# Altium PCB POV_Display.PcbDoc (part 1 of 4)
Units mm, origin at the board's own origin, x right, y up, seen from the top; angles counter-clockwise.
Board outline 207.01 x 48.01 mm, 4 copper layers (Top Layer, GND, Power, Bottom Layer), stack 1.586 mm thick; 227 components, 374 nets, 1196 pads, 657 vias.
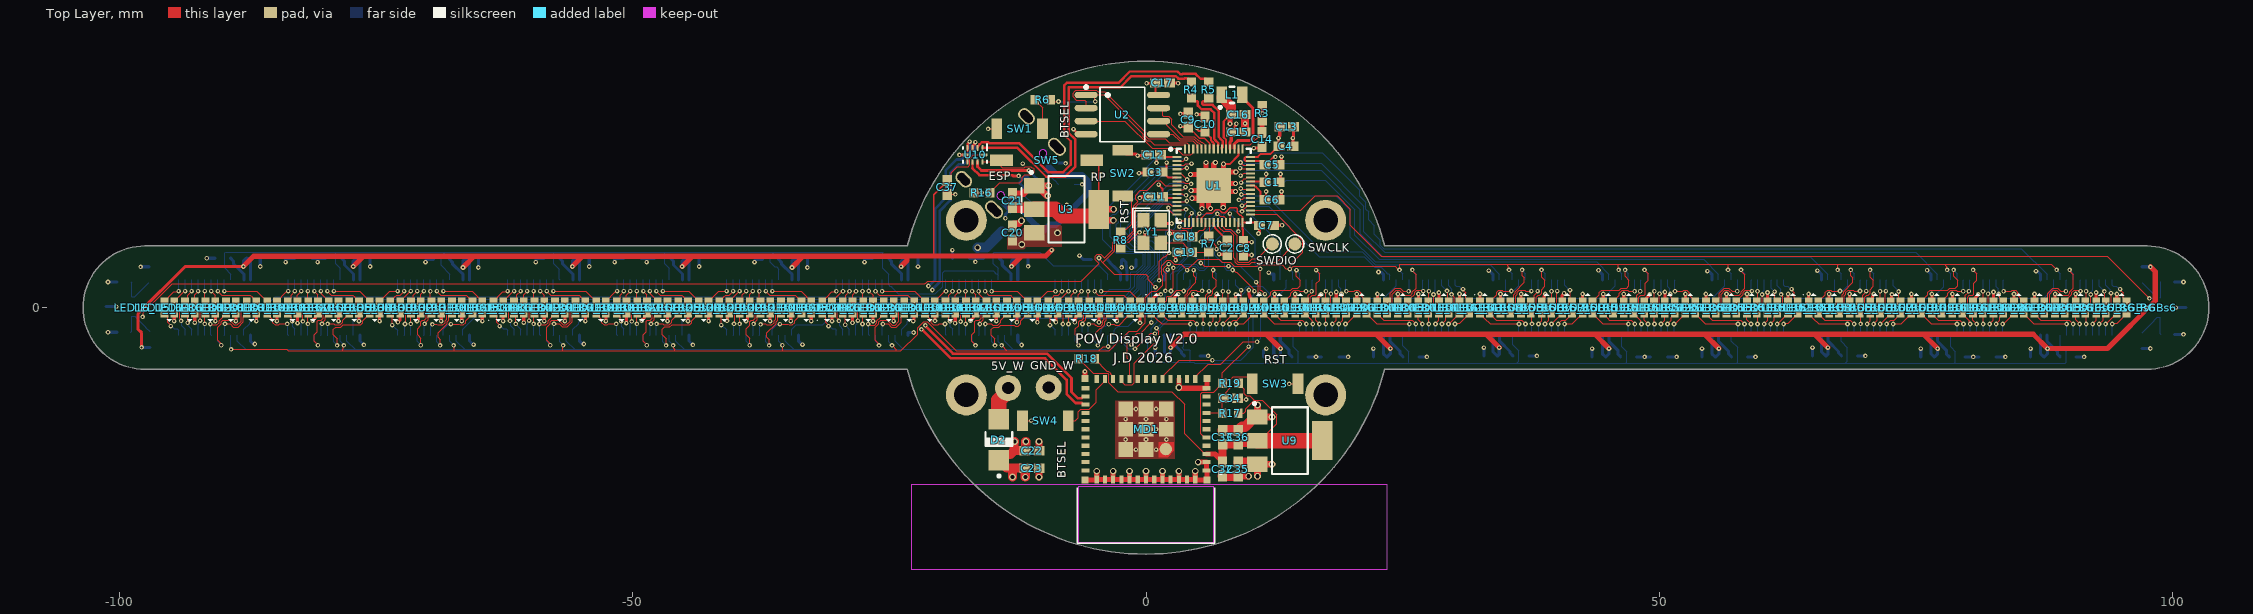
[diagram p0: Top Layer view]
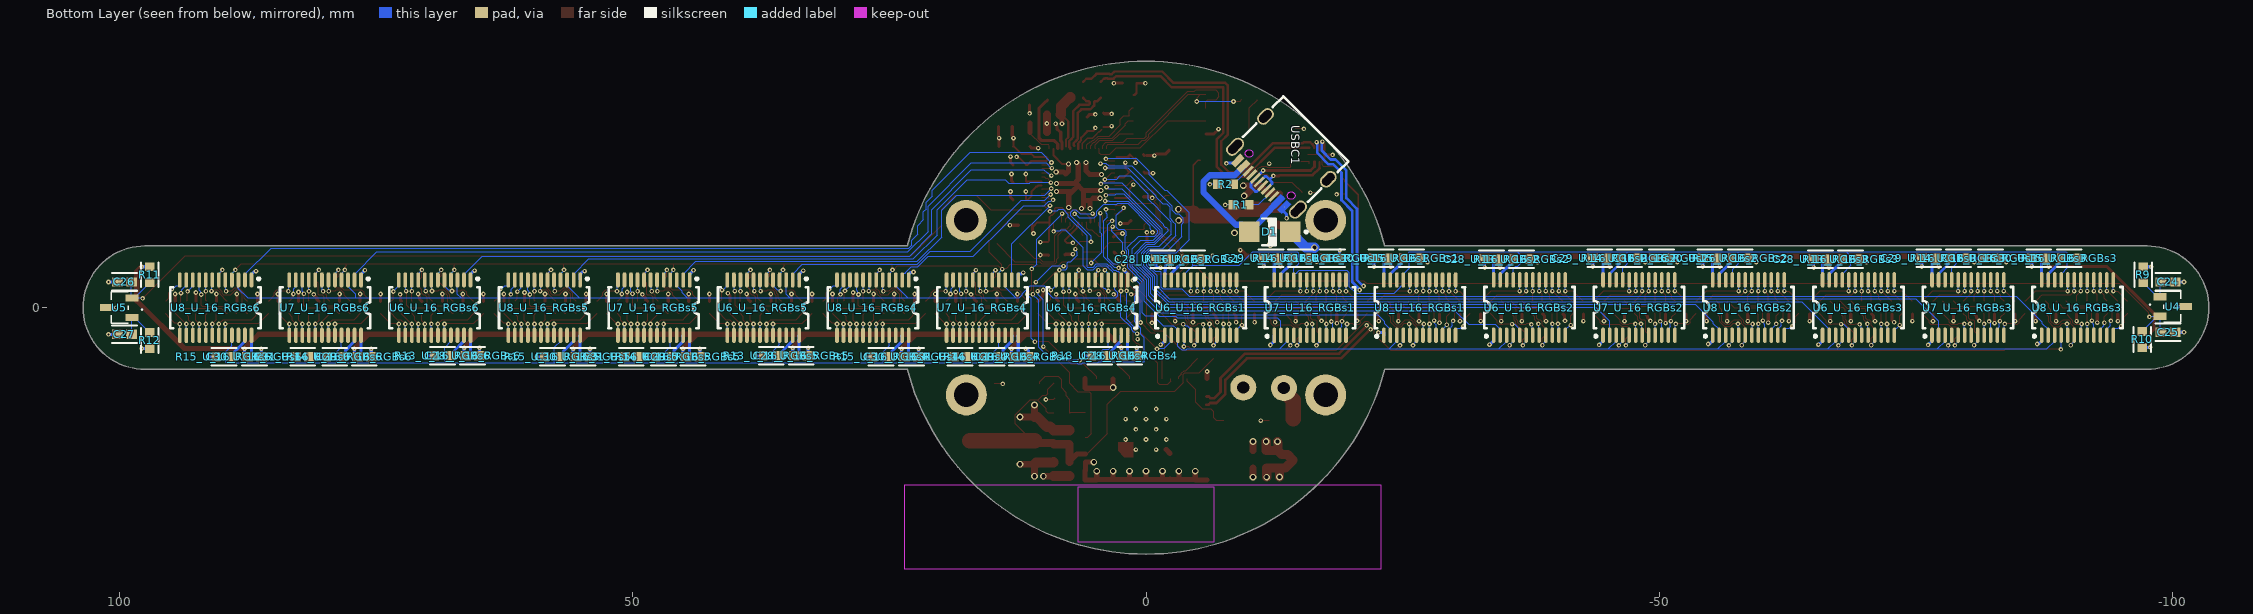
[diagram p1: Bottom Layer view, seen from below]
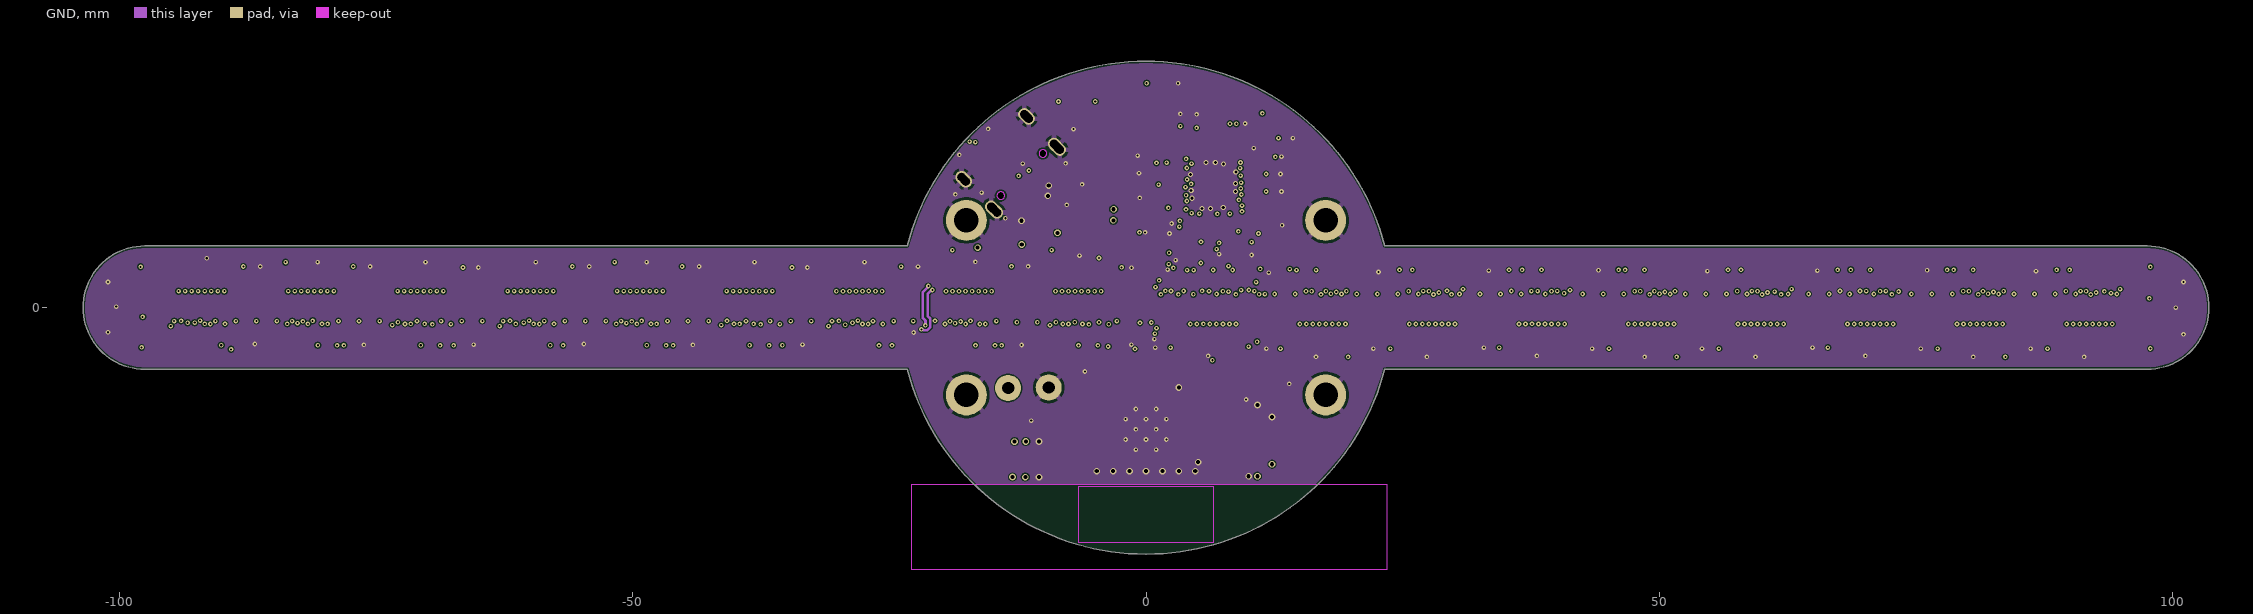
[diagram p2: GND]
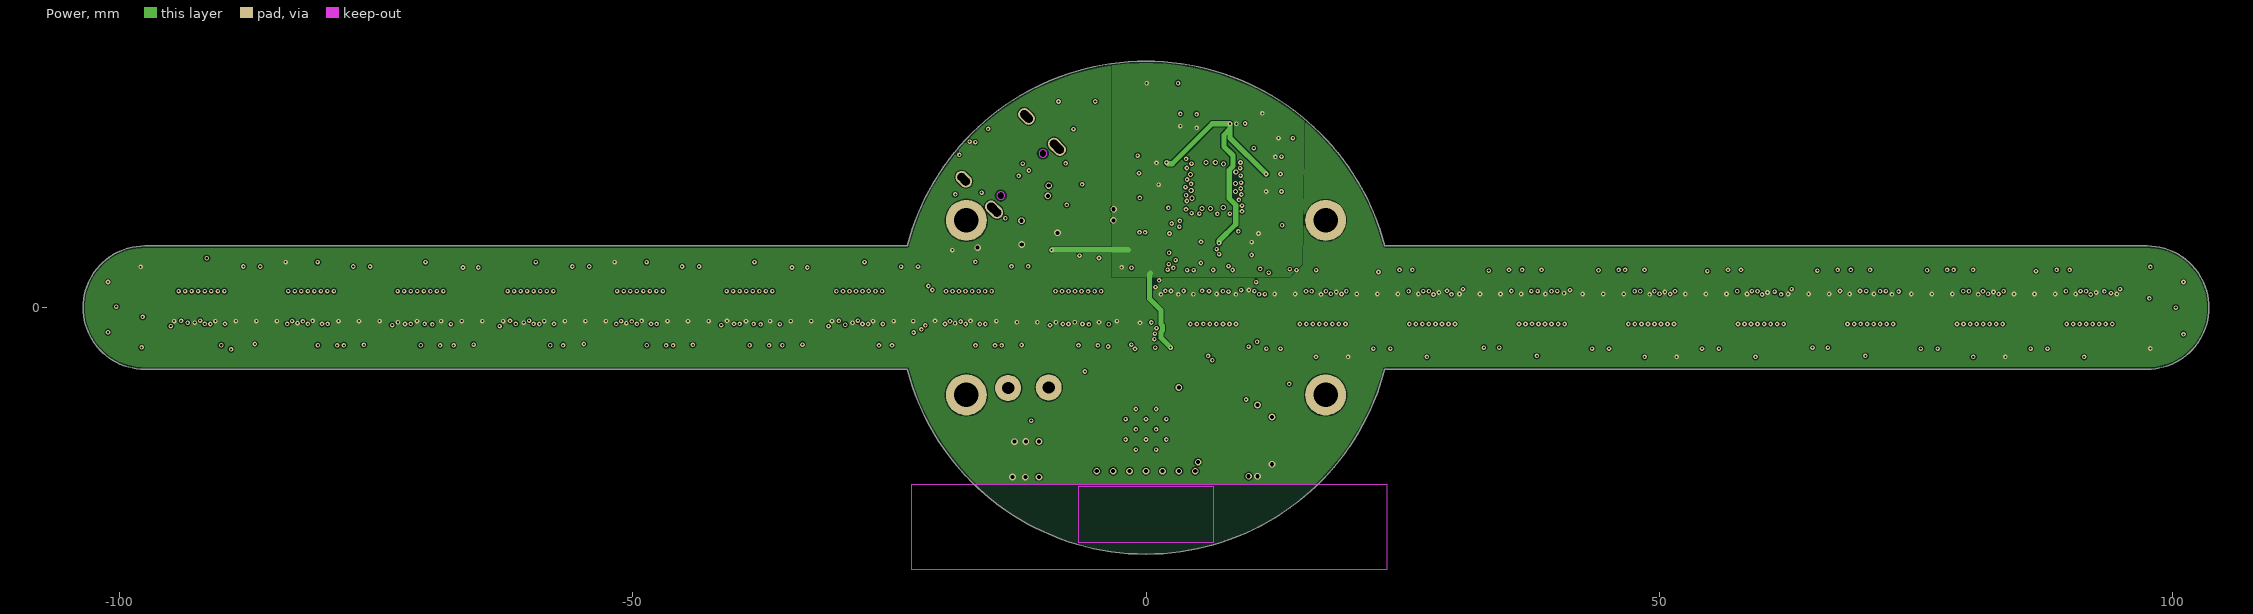
[diagram p3: Power]
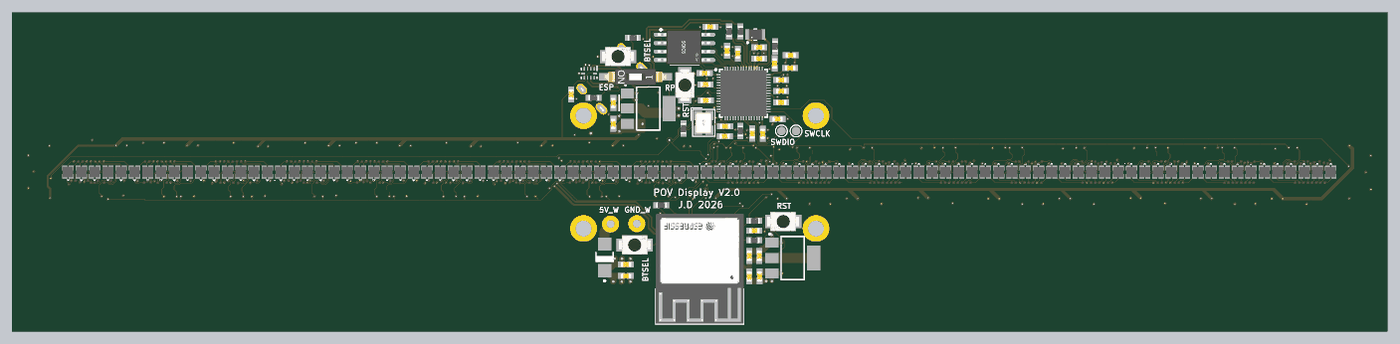
[diagram p7: 3D render of the assembled board from above, using the file's embedded part models]
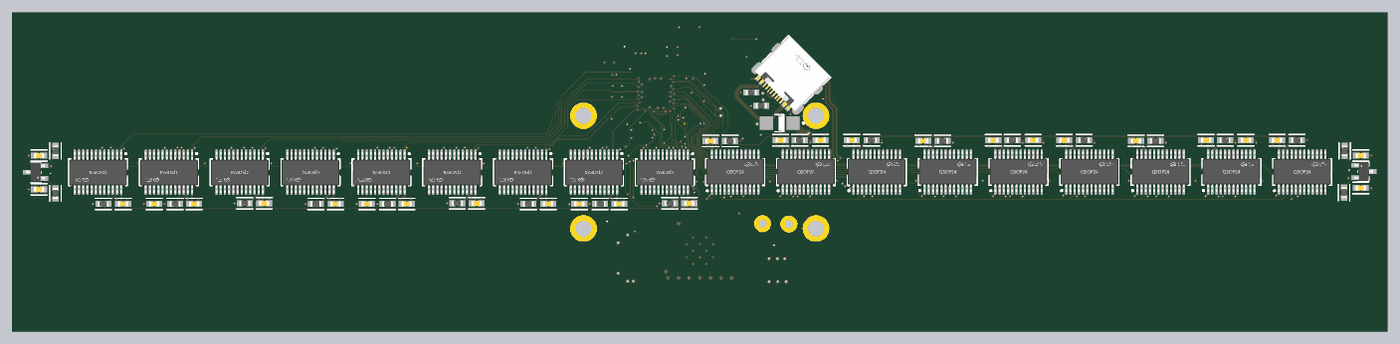
[diagram p8: 3D render of the assembled board from below, using the file's embedded part models]

## Layer stack, top to bottom
Top Solder: solder mask 0.0305, Solder Resist, Dk 3.8
Top Layer: signal copper 0.035
Dielectric 2: prepreg 0.2104, PP-006, Dk 4.4
GND: signal copper 0.0152
Dielectric 1: dielectric 1.065, FR-4, Dk 4.6
Power: signal copper 0.0152
Dielectric 3: prepreg 0.2104, PP-006, Dk 4.4
Bottom Layer: signal copper 0.035
Bottom Solder: solder mask 0.0305, Solder Resist, Dk 3.8

## Board outline
-97.5,-6.005 -23.266,-6.005 -23.244,-6 ccw(c0,0) 0,-24.005 ccw(c0,0) 23.247,-5.986 23.266,-6.005 97.5,-6.005 ccw(c97.5,0) 103.505,0 ccw(c97.5,0) 97.5,6.005 23.246,6.005 23.241,6.011 ccw(c0,0) 0,24.005 ccw(c0,0) -23.241,6.011 -23.246,6.005 -97.5,6.005 ccw(c-97.5,0) -103.505,0 ccw(c-97.5,0)

## Design rules (kind name [scope] priority, off if disabled: settings)
BoardOutlineClearance [All] p1: gap=0.2 ignorepadtopadclearanceinfootprint=FALSE
Clearance [All] p1: gap=0.1 ignorepadtopadclearanceinfootprint=TRUE except(0.35: Arc-THPad Track-THPad)
Clearance Clearance_1 [All] p2: gap=0.1 ignorepadtopadclearanceinfootprint=TRUE
DiffPairsRouting [All] p1: maxlimit=0.203 minlimit=0.203 mostfreqgap=0.203 toplayer_minwidth=0.24 toplayer_maxwidth=0.28 toplayer_prefwidth=0.261 midlayer1_minwidth=0.24 midlayer1_maxwidth=0.28 midlayer1_prefwidth=0.261 midlayer2_minwidth=0.24 midlayer2_maxwidth=0.28 midlayer2_prefwidth=0.261 bottomlayer_minwidth=0.24 bottomlayer_maxwidth=0.28 bottomlayer_prefwidth=0.261 maxuncoupledlength=3
HoleSize [All] p1: absolutevalues=TRUE maxlimit=6.3 minlimit=0.2 maxpercent=80.000 minpercent=20.000
HoleToHoleClearance [All] p1: gap=0.2 allowstackedmicrovias=TRUE
MinimumAnnularRing [Not IsVia] p1: minimumring=0.199
MinimumSolderMaskSliver MinimumSolderMaskSliver_Footprint [InAnyComponent vs InAnyComponent] p1: minsoldermaskwidth=0.09
MinimumSolderMaskSliver [All] p2: minsoldermaskwidth=0.1
PolygonConnect [All] p1: thpad.connectstyle=Relief thpad.reliefconductorwidth=0.5 thpad.reliefentries=4 thpad.polygonreliefangle="90 Angle" thpad.airgapwidth=0.254 thpad.conductorbypadedge=TRUE thpad.mindistance=0.381 thpad.enablemindistance=FALSE smdpad.connectstyle=Direct smdpad.reliefconductorwidth=0.254 smdpad.reliefentries=4 smdpad.polygonreliefangle="90 Angle" smdpad.airgapwidth=0.254 via.connectstyle=Direct via.reliefconductorwidth=0.254 via.reliefentries=4 via.polygonreliefangle="90 Angle" via.airgapwidth=0.254
RoomDefinition U_16_RGBs1 [InComponentClass('U_16_RGBs1')] p1: confinementstyle=ConfineIn formatcopy=TRUE lockcomponents=FALSE outline -0.054,5.8 -32.054,5.8 -32.054,-4.2 -0.054,-4.2
RoomDefinition U_16_RGBs6 [InComponentClass('U_16_RGBs6')] p2: confinementstyle=ConfineIn formatcopy=TRUE lockcomponents=FALSE outline 64,-5.8 96,-5.8 96,4.2 64,4.2
RoomDefinition U_16_RGBs5 [InComponentClass('U_16_RGBs5')] p3: confinementstyle=ConfineIn formatcopy=TRUE lockcomponents=FALSE outline 32,-5.8 64,-5.8 64,4.2 32,4.2
RoomDefinition U_16_RGBs4 [InComponentClass('U_16_RGBs4')] p4: confinementstyle=ConfineIn formatcopy=TRUE lockcomponents=FALSE outline 0,-5.8 32,-5.8 32,4.2 0,4.2
RoomDefinition U_16_RGBs3 [InComponentClass('U_16_RGBs3')] p5: confinementstyle=ConfineIn formatcopy=TRUE lockcomponents=FALSE outline -64.107,5.808 -96.107,5.808 -96.107,-4.192 -64.107,-4.192
RoomDefinition U_16_RGBs2 [InComponentClass('U_16_RGBs2')] p6: confinementstyle=ConfineIn formatcopy=TRUE lockcomponents=FALSE outline -32.071,5.808 -64.071,5.808 -64.071,-4.192 -32.071,-4.192
RoutingVias [All] p1: holewidth=0.2 width=0.45 viastyle="Through Hole" minholewidth=0.2 minwidth=0.45 maxholewidth=0.4 maxwidth=0.65
SilkToSilkClearance [All] p1: silktosilkclearance=0.15
SilkToSolderMaskClearance [IsPad] p1: minsilkscreentomaskgap=0.15 clearancetoexposedcopper=TRUE
SolderMaskExpansion [All] p1: expansion=0 istentingtop=FALSE
SupplyNets "Schematic Supply Nets_7" [InNet('+3V3_ESP')] p1: voltage=0.000
SupplyNets "Schematic Supply Nets_6" [InNet('+3V3_RP')] p2: voltage=0.000
SupplyNets "Schematic Supply Nets_2" [InNet('+1V1')] p3: voltage=0.000
SupplyNets "Schematic Supply Nets_1" [InNet('+5V')] p4: voltage=0.000
SupplyNets "Schematic Supply Nets" [InNet('GND')] p5: voltage=0.000
Width [All] p1: maxlimit=3 minlimit=0.1 preferedwidth=0.1
24 further rules are at their usual default settings.

## Classes and differential pairs
component class U_ESP32: C32 C33 C34 C35 C36 MD1 R17 R18 R19 SW3 SW4 U9
component class U_16_RGBs6: C28_U_16_RGBs6 C29_U_16_RGBs6 C30_U_16_RGBs6 C31_U_16_RGBs6 LED1_U_16_RGBs6 LED2_U_16_RGBs6 LED3_U_16_RGBs6 LED4_U_16_RGBs6 LED5_U_16_RGBs6 LED6_U_16_RGBs6 LED7_U_16_RGBs6 LED8_U_16_RGBs6 LED9_U_16_RGBs6 LED10_U_16_RGBs6 LED11_U_16_RGBs6 LED12_U_16_RGBs6 LED13_U_16_RGBs6 LED14_U_16_RGBs6 LED15_U_16_RGBs6 LED16_U_16_RGBs6 R13_U_16_RGBs6 R14_U_16_RGBs6 R15_U_16_RGBs6 U6_U_16_RGBs6 U7_U_16_RGBs6 U8_U_16_RGBs6
component class U_16_RGBs5: C28_U_16_RGBs5 C29_U_16_RGBs5 C30_U_16_RGBs5 C31_U_16_RGBs5 LED1_U_16_RGBs5 LED2_U_16_RGBs5 LED3_U_16_RGBs5 LED4_U_16_RGBs5 LED5_U_16_RGBs5 LED6_U_16_RGBs5 LED7_U_16_RGBs5 LED8_U_16_RGBs5 LED9_U_16_RGBs5 LED10_U_16_RGBs5 LED11_U_16_RGBs5 LED12_U_16_RGBs5 LED13_U_16_RGBs5 LED14_U_16_RGBs5 LED15_U_16_RGBs5 LED16_U_16_RGBs5 R13_U_16_RGBs5 R14_U_16_RGBs5 R15_U_16_RGBs5 U6_U_16_RGBs5 U7_U_16_RGBs5 U8_U_16_RGBs5
component class U_16_RGBs4: C28_U_16_RGBs4 C29_U_16_RGBs4 C30_U_16_RGBs4 C31_U_16_RGBs4 LED1_U_16_RGBs4 LED2_U_16_RGBs4 LED3_U_16_RGBs4 LED4_U_16_RGBs4 LED5_U_16_RGBs4 LED6_U_16_RGBs4 LED7_U_16_RGBs4 LED8_U_16_RGBs4 LED9_U_16_RGBs4 LED10_U_16_RGBs4 LED11_U_16_RGBs4 LED12_U_16_RGBs4 LED13_U_16_RGBs4 LED14_U_16_RGBs4 LED15_U_16_RGBs4 LED16_U_16_RGBs4 R13_U_16_RGBs4 R14_U_16_RGBs4 R15_U_16_RGBs4 U6_U_16_RGBs4 U7_U_16_RGBs4 U8_U_16_RGBs4
component class U_16_RGBs3: C28_U_16_RGBs3 C29_U_16_RGBs3 C30_U_16_RGBs3 C31_U_16_RGBs3 LED1_U_16_RGBs3 LED2_U_16_RGBs3 LED3_U_16_RGBs3 LED4_U_16_RGBs3 LED5_U_16_RGBs3 LED6_U_16_RGBs3 LED7_U_16_RGBs3 LED8_U_16_RGBs3 LED9_U_16_RGBs3 LED10_U_16_RGBs3 LED11_U_16_RGBs3 LED12_U_16_RGBs3 LED13_U_16_RGBs3 LED14_U_16_RGBs3 LED15_U_16_RGBs3 LED16_U_16_RGBs3 R13_U_16_RGBs3 R14_U_16_RGBs3 R15_U_16_RGBs3 U6_U_16_RGBs3 U7_U_16_RGBs3 U8_U_16_RGBs3
component class U_16_RGBs2: C28_U_16_RGBs2 C29_U_16_RGBs2 C30_U_16_RGBs2 C31_U_16_RGBs2 LED1_U_16_RGBs2 LED2_U_16_RGBs2 LED3_U_16_RGBs2 LED4_U_16_RGBs2 LED5_U_16_RGBs2 LED6_U_16_RGBs2 LED7_U_16_RGBs2 LED8_U_16_RGBs2 LED9_U_16_RGBs2 LED10_U_16_RGBs2 LED11_U_16_RGBs2 LED12_U_16_RGBs2 LED13_U_16_RGBs2 LED14_U_16_RGBs2 LED15_U_16_RGBs2 LED16_U_16_RGBs2 R13_U_16_RGBs2 R14_U_16_RGBs2 R15_U_16_RGBs2 U6_U_16_RGBs2 U7_U_16_RGBs2 U8_U_16_RGBs2
component class U_16_RGBs1: C28_U_16_RGBs1 C29_U_16_RGBs1 C30_U_16_RGBs1 C31_U_16_RGBs1 LED1_U_16_RGBs1 LED2_U_16_RGBs1 LED3_U_16_RGBs1 LED4_U_16_RGBs1 LED5_U_16_RGBs1 LED6_U_16_RGBs1 LED7_U_16_RGBs1 LED8_U_16_RGBs1 LED9_U_16_RGBs1 LED10_U_16_RGBs1 LED11_U_16_RGBs1 LED12_U_16_RGBs1 LED13_U_16_RGBs1 LED14_U_16_RGBs1 LED15_U_16_RGBs1 LED16_U_16_RGBs1 R13_U_16_RGBs1 R14_U_16_RGBs1 R15_U_16_RGBs1 U6_U_16_RGBs1 U7_U_16_RGBs1 U8_U_16_RGBs1
channel class 16_RGBs: U_16_RGBs1 U_16_RGBs2 U_16_RGBs3 U_16_RGBs4 U_16_RGBs5 U_16_RGBs6
component class U_RP2350: C1 C2 C3 C4 C5 C6 C7 C8 C9 C10 C11 C12 C13 C14 C15 C16 C17 C18 C19 C20 C21 L1 R3 R4 R5 R6 R7 R8 SW1 SW2 SWCLK SWDIO U1 U2 U3 Y1
component class POV_Display: 5V_W C22 C23 C24 C25 C26 C27 C37 D1 D2 GND_W R1 R2 R9 R10 R11 R12 R16 SW5 U4 U5 U10 USBC1
differential pair USB_D: +USB_D_P -USB_D_N
differential pair RP_USB_D: +RP_USB_D_P -RP_USB_D_N
differential pair ESP_USB_D: +ESP_USB_D_P -ESP_USB_D_N
differential pair USB_MCU_D: +USB_MCU_D_P -USB_MCU_D_N

## Components (designator, comment, footprint, x,y, rotation, side; value= is the part's Value field where it differs from the comment)
5V_W "Wireless +5V input" "THT 100mil pad-Footprint-1" -13.425,-7.825 r0 top
C1 "Cap 100nF 0603" FP-CC0603-DA-IPC_B 12.954,12.2 r180 top value=100nF
C2 "Cap 4.7uF 0603" FP-CC0603-DA-IPC_B 7.9,5.146 r90 top value=4.7uF
C3 "Cap 100nF 0603" FP-CC0603-DA-IPC_B 0.2,13.2 r0 top value=100nF
C4 "Cap 100nF 0603" FP-CC0603-DA-IPC_B 14.3,15.7 r180 top value=100nF
C5 "Cap 100nF 0603" FP-CC0603-DA-IPC_B 12.954,13.9 r180 top value=100nF
C6 "Cap 100nF 0603" FP-CC0603-DA-IPC_B 12.954,10.5 r180 top value=100nF
C7 "Cap 100nF 0603" FP-CC0603-DA-IPC_B 12.404,8 r180 top value=100nF
C8 "Cap 100nF 0603" FP-CC0603-DA-IPC_B 9.5,5.1 r90 top value=100nF
C9 "Cap 100nF 0603" FP-CC0603-DA-IPC_B 4.125,18.95 r270 top value=100nF
C10 "Cap 100nF 0603" FP-CC0603-DA-IPC_B 5.75,18.55 r270 top value=100nF
C11 "Cap 100nF 0603" FP-CC0603-DA-IPC_B 0.246,10.8 r0 top value=100nF
C12 "Cap 100nF 0603" FP-CC0603-DA-IPC_B 0.071,14.9 r0 top value=100nF
C13 "Cap 22uF 0603" FP-CC0603-DA-IPC_B 14.375,17.625 r180 top value=22uF
C14 "Cap 4.7uF 0603" FP-CC0603-DA-IPC_B 11.3,15.7 r90 top value=4.7uF
C15 "Cap 4.7uF 0603" FP-CC0603-DA-IPC_B 9.654,17.1 r180 top value=4.7uF
C16 "Cap 4.7uF 0603" FP-CC0603-DA-IPC_B 9.654,18.8 r180 top value=4.7uF
C17 "Cap 100nF 0603" FP-CC0603-DA-IPC_B 0.921,21.875 r0 top value=100nF
C18 "Cap 15pF 0603" FP-CC0603-DA-IPC_B 3.146,6.9 r0 top value=15pF
C19 "Cap 15pF 0603" FP-CC0603-DA-IPC_B 4.454,5.4 r180 top value=15pF
C20 "Cap 10uF 0603" FP-CC0603-DA-IPC_B -13,7.954 r270 top value=10uF
C21 "Cap 10uF 0603" FP-CC0603-DA-IPC_B -13,11.1 r270 top value=10uF
C22 "Cap 22uF 0603" FP-CC0603-DA-IPC_B -11.775,-13.925 r0 top value=22uF
C23 "Cap 100nF 0603" FP-CC0603-DA-IPC_B -11.779,-15.625 r0 top value=100nF
C24 "Cap 4.7nF 0603" FP-CC0603-DA-IPC_B -100.2,2.5 r0 bottom value=4.7nF
C25 "Cap 1nF 0603" FP-CC0603-DA-IPC_B -100.2,-2.4 r0 bottom value=1nF
C26 "Cap 1nF 0603" FP-CC0603-DA-IPC_B 100.154,2.5 r180 bottom value=1nF
C27 "Cap 4.7nF 0603" FP-CC0603-DA-IPC_B 100.154,-2.6 r180 bottom value=4.7nF
C28_U_16_RGBs1 "Cap 100nF 0603" FP-CC0603-DA-IPC_B -2.308,4.7 r0 bottom value=100nF (schematic designator C28)
C28_U_16_RGBs2 "Cap 100nF 0603" FP-CC0603-DA-IPC_B -34.325,4.708 r0 bottom value=100nF (schematic designator C28)
C28_U_16_RGBs3 "Cap 100nF 0603" FP-CC0603-DA-IPC_B -66.361,4.708 r0 bottom value=100nF (schematic designator C28)
C28_U_16_RGBs4 "Cap 100nF 0603" FP-CC0603-DA-IPC_B 2.254,-4.7 r180 bottom value=100nF (schematic designator C28)
C28_U_16_RGBs5 "Cap 100nF 0603" FP-CC0603-DA-IPC_B 34.254,-4.7 r180 bottom value=100nF (schematic designator C28)
C28_U_16_RGBs6 "Cap 100nF 0603" FP-CC0603-DA-IPC_B 66.254,-4.7 r180 bottom value=100nF (schematic designator C28)
C29_U_16_RGBs1 "Cap 100nF 0603" FP-CC0603-DA-IPC_B -12.854,4.8 r0 bottom value=100nF (schematic designator C29)
C29_U_16_RGBs2 "Cap 100nF 0603" FP-CC0603-DA-IPC_B -44.871,4.808 r0 bottom value=100nF (schematic designator C29)
C29_U_16_RGBs3 "Cap 100nF 0603" FP-CC0603-DA-IPC_B -76.908,4.808 r0 bottom value=100nF (schematic designator C29)
C29_U_16_RGBs4 "Cap 100nF 0603" FP-CC0603-DA-IPC_B 12.8,-4.8 r180 bottom value=100nF (schematic designator C29)
C29_U_16_RGBs5 "Cap 100nF 0603" FP-CC0603-DA-IPC_B 44.8,-4.8 r180 bottom value=100nF (schematic designator C29)
C29_U_16_RGBs6 "Cap 100nF 0603" FP-CC0603-DA-IPC_B 76.8,-4.8 r180 bottom value=100nF (schematic designator C29)
C30_U_16_RGBs1 "Cap 100nF 0603" FP-CC0603-DA-IPC_B -23.554,4.8 r0 bottom value=100nF (schematic designator C30)
C30_U_16_RGBs2 "Cap 100nF 0603" FP-CC0603-DA-IPC_B -55.571,4.808 r0 bottom value=100nF (schematic designator C30)
C30_U_16_RGBs3 "Cap 100nF 0603" FP-CC0603-DA-IPC_B -87.607,4.808 r0 bottom value=100nF (schematic designator C30)
C30_U_16_RGBs4 "Cap 100nF 0603" FP-CC0603-DA-IPC_B 23.5,-4.8 r180 bottom value=100nF (schematic designator C30)
C30_U_16_RGBs5 "Cap 100nF 0603" FP-CC0603-DA-IPC_B 55.5,-4.8 r180 bottom value=100nF (schematic designator C30)
C30_U_16_RGBs6 "Cap 100nF 0603" FP-CC0603-DA-IPC_B 87.5,-4.8 r180 bottom value=100nF (schematic designator C30)
C31_U_16_RGBs1 "Cap 22uF 0603" FP-CC0603-DA-IPC_B -17.5,4.8 r180 bottom value=22uF (schematic designator C31)
C31_U_16_RGBs2 "Cap 22uF 0603" FP-CC0603-DA-IPC_B -49.517,4.808 r180 bottom value=22uF (schematic designator C31)
C31_U_16_RGBs3 "Cap 22uF 0603" FP-CC0603-DA-IPC_B -81.554,4.808 r180 bottom value=22uF (schematic designator C31)
C31_U_16_RGBs4 "Cap 22uF 0603" FP-CC0603-DA-IPC_B 17.446,-4.8 r0 bottom value=22uF (schematic designator C31)
C31_U_16_RGBs5 "Cap 22uF 0603" FP-CC0603-DA-IPC_B 49.446,-4.8 r0 bottom value=22uF (schematic designator C31)
C31_U_16_RGBs6 "Cap 22uF 0603" FP-CC0603-DA-IPC_B 81.446,-4.8 r0 bottom value=22uF (schematic designator C31)
C32 "Cap 100nF 0603" FP-CC0603-DA-IPC_B 7.45,-16.4 r90 top value=100nF
C33 "Cap 22uF 0603" FP-CC0603-DA-IPC_B 7.475,-11.95 r270 top value=22uF
C34 "Cap 100nF 0603" FP-CC0603-DA-IPC_B 8.904,-8.825 r180 top value=100nF
C35 "Cap 10uF 0603" FP-CC0603-DA-IPC_B 9,-16.404 r90 top value=10uF
C36 "Cap 10uF 0603" FP-CC0603-DA-IPC_B 8.975,-11.95 r270 top value=10uF
C37 "Cap 100nF 0603" FP-CC0603-DA-IPC_B -19.35,11.025 r90 top value=100nF
D1 "MBRA140T3G" ONSC-SMA-2-403D-02_V -12.05,7.375 r0 bottom
D2 "MBRA140T3G" ONSC-SMA-2-403D-02_V -14.325,-12.85 r90 top
GND_W "Wireless ground" "THT 100mil pad-Footprint-1" -9.475,-7.775 r0 top
L1 "AOTA-B201610S3R3-101-T" AOTA-B201610S3R3-101-T-Footprint-1 8.375,20.725 r180 top value=3.3uH
LED1_U_16_RGBs1 "EKINGLUX E6C0606RGBC3UDA" "EKINGLUX E6C0606RGBC3UDA-Footprint-1" -1.054,0 r270 top (schematic designator LED1)
LED1_U_16_RGBs2 "EKINGLUX E6C0606RGBC3UDA" "EKINGLUX E6C0606RGBC3UDA-Footprint-1" -33.071,0.008 r270 top (schematic designator LED1)
LED1_U_16_RGBs3 "EKINGLUX E6C0606RGBC3UDA" "EKINGLUX E6C0606RGBC3UDA-Footprint-1" -65.107,0.008 r270 top (schematic designator LED1)
LED1_U_16_RGBs4 "EKINGLUX E6C0606RGBC3UDA" "EKINGLUX E6C0606RGBC3UDA-Footprint-1" 1,0 r90 top (schematic designator LED1)
LED1_U_16_RGBs5 "EKINGLUX E6C0606RGBC3UDA" "EKINGLUX E6C0606RGBC3UDA-Footprint-1" 33,0 r90 top (schematic designator LED1)
LED1_U_16_RGBs6 "EKINGLUX E6C0606RGBC3UDA" "EKINGLUX E6C0606RGBC3UDA-Footprint-1" 65,0 r90 top (schematic designator LED1)
LED2_U_16_RGBs1 "EKINGLUX E6C0606RGBC3UDA" "EKINGLUX E6C0606RGBC3UDA-Footprint-1" -3.054,0 r270 top (schematic designator LED2)
LED2_U_16_RGBs2 "EKINGLUX E6C0606RGBC3UDA" "EKINGLUX E6C0606RGBC3UDA-Footprint-1" -35.071,0.008 r270 top (schematic designator LED2)
LED2_U_16_RGBs3 "EKINGLUX E6C0606RGBC3UDA" "EKINGLUX E6C0606RGBC3UDA-Footprint-1" -67.107,0.008 r270 top (schematic designator LED2)
LED2_U_16_RGBs4 "EKINGLUX E6C0606RGBC3UDA" "EKINGLUX E6C0606RGBC3UDA-Footprint-1" 3,0 r90 top (schematic designator LED2)
LED2_U_16_RGBs5 "EKINGLUX E6C0606RGBC3UDA" "EKINGLUX E6C0606RGBC3UDA-Footprint-1" 35,0 r90 top (schematic designator LED2)
LED2_U_16_RGBs6 "EKINGLUX E6C0606RGBC3UDA" "EKINGLUX E6C0606RGBC3UDA-Footprint-1" 67,0 r90 top (schematic designator LED2)
LED3_U_16_RGBs1 "EKINGLUX E6C0606RGBC3UDA" "EKINGLUX E6C0606RGBC3UDA-Footprint-1" -5.054,0 r270 top (schematic designator LED3)
LED3_U_16_RGBs2 "EKINGLUX E6C0606RGBC3UDA" "EKINGLUX E6C0606RGBC3UDA-Footprint-1" -37.071,0.008 r270 top (schematic designator LED3)
LED3_U_16_RGBs3 "EKINGLUX E6C0606RGBC3UDA" "EKINGLUX E6C0606RGBC3UDA-Footprint-1" -69.107,0.008 r270 top (schematic designator LED3)
LED3_U_16_RGBs4 "EKINGLUX E6C0606RGBC3UDA" "EKINGLUX E6C0606RGBC3UDA-Footprint-1" 5,0 r90 top (schematic designator LED3)
LED3_U_16_RGBs5 "EKINGLUX E6C0606RGBC3UDA" "EKINGLUX E6C0606RGBC3UDA-Footprint-1" 37,0 r90 top (schematic designator LED3)
LED3_U_16_RGBs6 "EKINGLUX E6C0606RGBC3UDA" "EKINGLUX E6C0606RGBC3UDA-Footprint-1" 69,0 r90 top (schematic designator LED3)
LED4_U_16_RGBs1 "EKINGLUX E6C0606RGBC3UDA" "EKINGLUX E6C0606RGBC3UDA-Footprint-1" -7.054,0 r270 top (schematic designator LED4)
LED4_U_16_RGBs2 "EKINGLUX E6C0606RGBC3UDA" "EKINGLUX E6C0606RGBC3UDA-Footprint-1" -39.071,0.008 r270 top (schematic designator LED4)
LED4_U_16_RGBs3 "EKINGLUX E6C0606RGBC3UDA" "EKINGLUX E6C0606RGBC3UDA-Footprint-1" -71.107,0.008 r270 top (schematic designator LED4)
LED4_U_16_RGBs4 "EKINGLUX E6C0606RGBC3UDA" "EKINGLUX E6C0606RGBC3UDA-Footprint-1" 7,0 r90 top (schematic designator LED4)
LED4_U_16_RGBs5 "EKINGLUX E6C0606RGBC3UDA" "EKINGLUX E6C0606RGBC3UDA-Footprint-1" 39,0 r90 top (schematic designator LED4)
LED4_U_16_RGBs6 "EKINGLUX E6C0606RGBC3UDA" "EKINGLUX E6C0606RGBC3UDA-Footprint-1" 71,0 r90 top (schematic designator LED4)
LED5_U_16_RGBs1 "EKINGLUX E6C0606RGBC3UDA" "EKINGLUX E6C0606RGBC3UDA-Footprint-1" -9.054,0 r270 top (schematic designator LED5)
LED5_U_16_RGBs2 "EKINGLUX E6C0606RGBC3UDA" "EKINGLUX E6C0606RGBC3UDA-Footprint-1" -41.071,0.008 r270 top (schematic designator LED5)
LED5_U_16_RGBs3 "EKINGLUX E6C0606RGBC3UDA" "EKINGLUX E6C0606RGBC3UDA-Footprint-1" -73.107,0.008 r270 top (schematic designator LED5)
LED5_U_16_RGBs4 "EKINGLUX E6C0606RGBC3UDA" "EKINGLUX E6C0606RGBC3UDA-Footprint-1" 9,0 r90 top (schematic designator LED5)
LED5_U_16_RGBs5 "EKINGLUX E6C0606RGBC3UDA" "EKINGLUX E6C0606RGBC3UDA-Footprint-1" 41,0 r90 top (schematic designator LED5)
LED5_U_16_RGBs6 "EKINGLUX E6C0606RGBC3UDA" "EKINGLUX E6C0606RGBC3UDA-Footprint-1" 73,0 r90 top (schematic designator LED5)
LED6_U_16_RGBs1 "EKINGLUX E6C0606RGBC3UDA" "EKINGLUX E6C0606RGBC3UDA-Footprint-1" -11.054,0 r270 top (schematic designator LED6)
LED6_U_16_RGBs2 "EKINGLUX E6C0606RGBC3UDA" "EKINGLUX E6C0606RGBC3UDA-Footprint-1" -43.071,0.008 r270 top (schematic designator LED6)
LED6_U_16_RGBs3 "EKINGLUX E6C0606RGBC3UDA" "EKINGLUX E6C0606RGBC3UDA-Footprint-1" -75.107,0.008 r270 top (schematic designator LED6)
LED6_U_16_RGBs4 "EKINGLUX E6C0606RGBC3UDA" "EKINGLUX E6C0606RGBC3UDA-Footprint-1" 11,0 r90 top (schematic designator LED6)
LED6_U_16_RGBs5 "EKINGLUX E6C0606RGBC3UDA" "EKINGLUX E6C0606RGBC3UDA-Footprint-1" 43,0 r90 top (schematic designator LED6)
LED6_U_16_RGBs6 "EKINGLUX E6C0606RGBC3UDA" "EKINGLUX E6C0606RGBC3UDA-Footprint-1" 75,0 r90 top (schematic designator LED6)
LED7_U_16_RGBs1 "EKINGLUX E6C0606RGBC3UDA" "EKINGLUX E6C0606RGBC3UDA-Footprint-1" -13.054,0 r270 top (schematic designator LED7)
LED7_U_16_RGBs2 "EKINGLUX E6C0606RGBC3UDA" "EKINGLUX E6C0606RGBC3UDA-Footprint-1" -45.071,0.008 r270 top (schematic designator LED7)
LED7_U_16_RGBs3 "EKINGLUX E6C0606RGBC3UDA" "EKINGLUX E6C0606RGBC3UDA-Footprint-1" -77.107,0.008 r270 top (schematic designator LED7)
LED7_U_16_RGBs4 "EKINGLUX E6C0606RGBC3UDA" "EKINGLUX E6C0606RGBC3UDA-Footprint-1" 13,0 r90 top (schematic designator LED7)
LED7_U_16_RGBs5 "EKINGLUX E6C0606RGBC3UDA" "EKINGLUX E6C0606RGBC3UDA-Footprint-1" 45,0 r90 top (schematic designator LED7)
LED7_U_16_RGBs6 "EKINGLUX E6C0606RGBC3UDA" "EKINGLUX E6C0606RGBC3UDA-Footprint-1" 77,0 r90 top (schematic designator LED7)
LED8_U_16_RGBs1 "EKINGLUX E6C0606RGBC3UDA" "EKINGLUX E6C0606RGBC3UDA-Footprint-1" -15.054,0 r270 top (schematic designator LED8)
LED8_U_16_RGBs2 "EKINGLUX E6C0606RGBC3UDA" "EKINGLUX E6C0606RGBC3UDA-Footprint-1" -47.071,0.008 r270 top (schematic designator LED8)
LED8_U_16_RGBs3 "EKINGLUX E6C0606RGBC3UDA" "EKINGLUX E6C0606RGBC3UDA-Footprint-1" -79.107,0.008 r270 top (schematic designator LED8)
LED8_U_16_RGBs4 "EKINGLUX E6C0606RGBC3UDA" "EKINGLUX E6C0606RGBC3UDA-Footprint-1" 15,0 r90 top (schematic designator LED8)
LED8_U_16_RGBs5 "EKINGLUX E6C0606RGBC3UDA" "EKINGLUX E6C0606RGBC3UDA-Footprint-1" 47,0 r90 top (schematic designator LED8)
LED8_U_16_RGBs6 "EKINGLUX E6C0606RGBC3UDA" "EKINGLUX E6C0606RGBC3UDA-Footprint-1" 79,0 r90 top (schematic designator LED8)
LED9_U_16_RGBs1 "EKINGLUX E6C0606RGBC3UDA" "EKINGLUX E6C0606RGBC3UDA-Footprint-1" -17.054,0 r270 top (schematic designator LED9)
LED9_U_16_RGBs2 "EKINGLUX E6C0606RGBC3UDA" "EKINGLUX E6C0606RGBC3UDA-Footprint-1" -49.071,0.008 r270 top (schematic designator LED9)
LED9_U_16_RGBs3 "EKINGLUX E6C0606RGBC3UDA" "EKINGLUX E6C0606RGBC3UDA-Footprint-1" -81.107,0.008 r270 top (schematic designator LED9)
LED9_U_16_RGBs4 "EKINGLUX E6C0606RGBC3UDA" "EKINGLUX E6C0606RGBC3UDA-Footprint-1" 17,0 r90 top (schematic designator LED9)
LED9_U_16_RGBs5 "EKINGLUX E6C0606RGBC3UDA" "EKINGLUX E6C0606RGBC3UDA-Footprint-1" 49,0 r90 top (schematic designator LED9)
LED9_U_16_RGBs6 "EKINGLUX E6C0606RGBC3UDA" "EKINGLUX E6C0606RGBC3UDA-Footprint-1" 81,0 r90 top (schematic designator LED9)
LED10_U_16_RGBs1 "EKINGLUX E6C0606RGBC3UDA" "EKINGLUX E6C0606RGBC3UDA-Footprint-1" -19.054,0 r270 top (schematic designator LED10)
LED10_U_16_RGBs2 "EKINGLUX E6C0606RGBC3UDA" "EKINGLUX E6C0606RGBC3UDA-Footprint-1" -51.071,0.008 r270 top (schematic designator LED10)
LED10_U_16_RGBs3 "EKINGLUX E6C0606RGBC3UDA" "EKINGLUX E6C0606RGBC3UDA-Footprint-1" -83.107,0.008 r270 top (schematic designator LED10)
LED10_U_16_RGBs4 "EKINGLUX E6C0606RGBC3UDA" "EKINGLUX E6C0606RGBC3UDA-Footprint-1" 19,0 r90 top (schematic designator LED10)
LED10_U_16_RGBs5 "EKINGLUX E6C0606RGBC3UDA" "EKINGLUX E6C0606RGBC3UDA-Footprint-1" 51,0 r90 top (schematic designator LED10)
LED10_U_16_RGBs6 "EKINGLUX E6C0606RGBC3UDA" "EKINGLUX E6C0606RGBC3UDA-Footprint-1" 83,0 r90 top (schematic designator LED10)
LED11_U_16_RGBs1 "EKINGLUX E6C0606RGBC3UDA" "EKINGLUX E6C0606RGBC3UDA-Footprint-1" -21.054,0 r270 top (schematic designator LED11)
LED11_U_16_RGBs2 "EKINGLUX E6C0606RGBC3UDA" "EKINGLUX E6C0606RGBC3UDA-Footprint-1" -53.071,0.008 r270 top (schematic designator LED11)
LED11_U_16_RGBs3 "EKINGLUX E6C0606RGBC3UDA" "EKINGLUX E6C0606RGBC3UDA-Footprint-1" -85.107,0.008 r270 top (schematic designator LED11)
LED11_U_16_RGBs4 "EKINGLUX E6C0606RGBC3UDA" "EKINGLUX E6C0606RGBC3UDA-Footprint-1" 21,0 r90 top (schematic designator LED11)
LED11_U_16_RGBs5 "EKINGLUX E6C0606RGBC3UDA" "EKINGLUX E6C0606RGBC3UDA-Footprint-1" 53,0 r90 top (schematic designator LED11)
LED11_U_16_RGBs6 "EKINGLUX E6C0606RGBC3UDA" "EKINGLUX E6C0606RGBC3UDA-Footprint-1" 85,0 r90 top (schematic designator LED11)
LED12_U_16_RGBs1 "EKINGLUX E6C0606RGBC3UDA" "EKINGLUX E6C0606RGBC3UDA-Footprint-1" -23.054,0 r270 top (schematic designator LED12)
LED12_U_16_RGBs2 "EKINGLUX E6C0606RGBC3UDA" "EKINGLUX E6C0606RGBC3UDA-Footprint-1" -55.071,0.008 r270 top (schematic designator LED12)
LED12_U_16_RGBs3 "EKINGLUX E6C0606RGBC3UDA" "EKINGLUX E6C0606RGBC3UDA-Footprint-1" -87.107,0.008 r270 top (schematic designator LED12)
LED12_U_16_RGBs4 "EKINGLUX E6C0606RGBC3UDA" "EKINGLUX E6C0606RGBC3UDA-Footprint-1" 23,0 r90 top (schematic designator LED12)
LED12_U_16_RGBs5 "EKINGLUX E6C0606RGBC3UDA" "EKINGLUX E6C0606RGBC3UDA-Footprint-1" 55,0 r90 top (schematic designator LED12)
LED12_U_16_RGBs6 "EKINGLUX E6C0606RGBC3UDA" "EKINGLUX E6C0606RGBC3UDA-Footprint-1" 87,0 r90 top (schematic designator LED12)
LED13_U_16_RGBs1 "EKINGLUX E6C0606RGBC3UDA" "EKINGLUX E6C0606RGBC3UDA-Footprint-1" -25.054,0 r270 top (schematic designator LED13)
LED13_U_16_RGBs2 "EKINGLUX E6C0606RGBC3UDA" "EKINGLUX E6C0606RGBC3UDA-Footprint-1" -57.071,0.008 r270 top (schematic designator LED13)
LED13_U_16_RGBs3 "EKINGLUX E6C0606RGBC3UDA" "EKINGLUX E6C0606RGBC3UDA-Footprint-1" -89.107,0.008 r270 top (schematic designator LED13)
LED13_U_16_RGBs4 "EKINGLUX E6C0606RGBC3UDA" "EKINGLUX E6C0606RGBC3UDA-Footprint-1" 25,0 r90 top (schematic designator LED13)
LED13_U_16_RGBs5 "EKINGLUX E6C0606RGBC3UDA" "EKINGLUX E6C0606RGBC3UDA-Footprint-1" 57,0 r90 top (schematic designator LED13)
LED13_U_16_RGBs6 "EKINGLUX E6C0606RGBC3UDA" "EKINGLUX E6C0606RGBC3UDA-Footprint-1" 89,0 r90 top (schematic designator LED13)
LED14_U_16_RGBs1 "EKINGLUX E6C0606RGBC3UDA" "EKINGLUX E6C0606RGBC3UDA-Footprint-1" -27.054,0 r270 top (schematic designator LED14)
LED14_U_16_RGBs2 "EKINGLUX E6C0606RGBC3UDA" "EKINGLUX E6C0606RGBC3UDA-Footprint-1" -59.071,0.008 r270 top (schematic designator LED14)
LED14_U_16_RGBs3 "EKINGLUX E6C0606RGBC3UDA" "EKINGLUX E6C0606RGBC3UDA-Footprint-1" -91.107,0.008 r270 top (schematic designator LED14)
LED14_U_16_RGBs4 "EKINGLUX E6C0606RGBC3UDA" "EKINGLUX E6C0606RGBC3UDA-Footprint-1" 27,0 r90 top (schematic designator LED14)
LED14_U_16_RGBs5 "EKINGLUX E6C0606RGBC3UDA" "EKINGLUX E6C0606RGBC3UDA-Footprint-1" 59,0 r90 top (schematic designator LED14)
LED14_U_16_RGBs6 "EKINGLUX E6C0606RGBC3UDA" "EKINGLUX E6C0606RGBC3UDA-Footprint-1" 91,0 r90 top (schematic designator LED14)
LED15_U_16_RGBs1 "EKINGLUX E6C0606RGBC3UDA" "EKINGLUX E6C0606RGBC3UDA-Footprint-1" -29.054,0 r270 top (schematic designator LED15)
LED15_U_16_RGBs2 "EKINGLUX E6C0606RGBC3UDA" "EKINGLUX E6C0606RGBC3UDA-Footprint-1" -61.071,0.008 r270 top (schematic designator LED15)
LED15_U_16_RGBs3 "EKINGLUX E6C0606RGBC3UDA" "EKINGLUX E6C0606RGBC3UDA-Footprint-1" -93.107,0.008 r270 top (schematic designator LED15)
LED15_U_16_RGBs4 "EKINGLUX E6C0606RGBC3UDA" "EKINGLUX E6C0606RGBC3UDA-Footprint-1" 29,0 r90 top (schematic designator LED15)
LED15_U_16_RGBs5 "EKINGLUX E6C0606RGBC3UDA" "EKINGLUX E6C0606RGBC3UDA-Footprint-1" 61,0 r90 top (schematic designator LED15)
LED15_U_16_RGBs6 "EKINGLUX E6C0606RGBC3UDA" "EKINGLUX E6C0606RGBC3UDA-Footprint-1" 93,0 r90 top (schematic designator LED15)
LED16_U_16_RGBs1 "EKINGLUX E6C0606RGBC3UDA" "EKINGLUX E6C0606RGBC3UDA-Footprint-1" -31.054,0 r270 top (schematic designator LED16)
LED16_U_16_RGBs2 "EKINGLUX E6C0606RGBC3UDA" "EKINGLUX E6C0606RGBC3UDA-Footprint-1" -63.071,0.008 r270 top (schematic designator LED16)
LED16_U_16_RGBs3 "EKINGLUX E6C0606RGBC3UDA" "EKINGLUX E6C0606RGBC3UDA-Footprint-1" -95.107,0.008 r270 top (schematic designator LED16)
LED16_U_16_RGBs4 "EKINGLUX E6C0606RGBC3UDA" "EKINGLUX E6C0606RGBC3UDA-Footprint-1" 31,0 r90 top (schematic designator LED16)
LED16_U_16_RGBs5 "EKINGLUX E6C0606RGBC3UDA" "EKINGLUX E6C0606RGBC3UDA-Footprint-1" 63,0 r90 top (schematic designator LED16)
LED16_U_16_RGBs6 "EKINGLUX E6C0606RGBC3UDA" "EKINGLUX E6C0606RGBC3UDA-Footprint-1" 95,0 r90 top (schematic designator LED16)
MD1 "ESP32-C3-MINI-1-H4" FP-ESP32-C3-MINI-1-H4-MFG 0,-11.85 r180 top
R1 "Res 5k1 0603" FP-RC0603-0_55-IPC_B -9.25,10 r180 bottom value=5.1k
R2 "Res 5k1 0603" FP-RC0603-0_55-IPC_B -7.75,12 r180 bottom value=5.1k
R3 "Res 33R 0603" FP-RC0603-0_55-IPC_B 11.325,18.927 r270 top value=33Ω
R4 "Res 27R 0603" FP-RC0603-0_55-IPC_B 4.425,21.2 r90 top value=27R
R5 "Res 27R 0603" FP-RC0603-0_55-IPC_B 6.125,21.2 r90 top value=27R
R6 "Res 1k 0603" FP-RC0603-0_55-IPC_B -10.05,20.225 r0 top value=1k
R7 "Res 1k 0603" FP-RC0603-0_55-IPC_B 6.1,6.2 r90 top value=1k
R8 "Res 1k 0603" FP-RC0603-0_55-IPC_B -2.45,6.575 r90 top value=1k
R9 "Res 100R 0603" FP-RC0603-0_55-IPC_B -97.1,3.2 r90 bottom value=100R
R10 "Res 4k7 0603" FP-RC0603-0_55-IPC_B -97,-3.1 r270 bottom value=4k7
R11 "Res 4k7 0603" FP-RC0603-0_55-IPC_B 97,3.2 r90 bottom value=4k7
R12 "Res 100R 0603" FP-RC0603-0_55-IPC_B 97,-3.2 r270 bottom value=100R
R13_U_16_RGBs1 "Res 2k 0603" FP-RC0603-0_55-IPC_B -4.554,4.7 r180 bottom value=2k (schematic designator R13)
R13_U_16_RGBs2 "Res 2k 0603" FP-RC0603-0_55-IPC_B -36.571,4.708 r180 bottom value=2k (schematic designator R13)
R13_U_16_RGBs3 "Res 2k 0603" FP-RC0603-0_55-IPC_B -68.608,4.708 r180 bottom value=2k (schematic designator R13)
R13_U_16_RGBs4 "Res 2k 0603" FP-RC0603-0_55-IPC_B 4.5,-4.7 r0 bottom value=2k (schematic designator R13)
R13_U_16_RGBs5 "Res 2k 0603" FP-RC0603-0_55-IPC_B 36.5,-4.7 r0 bottom value=2k (schematic designator R13)
R13_U_16_RGBs6 "Res 2k 0603" FP-RC0603-0_55-IPC_B 68.5,-4.7 r0 bottom value=2k (schematic designator R13)
R14_U_16_RGBs1 "Res 2k 0603" FP-RC0603-0_55-IPC_B -15.054,4.8 r180 bottom value=2k (schematic designator R14)
R14_U_16_RGBs2 "Res 2k 0603" FP-RC0603-0_55-IPC_B -47.071,4.808 r180 bottom value=2k (schematic designator R14)
R14_U_16_RGBs3 "Res 2k 0603" FP-RC0603-0_55-IPC_B -79.107,4.808 r180 bottom value=2k (schematic designator R14)
R14_U_16_RGBs4 "Res 2k 0603" FP-RC0603-0_55-IPC_B 15,-4.8 r0 bottom value=2k (schematic designator R14)
R14_U_16_RGBs5 "Res 2k 0603" FP-RC0603-0_55-IPC_B 47,-4.8 r0 bottom value=2k (schematic designator R14)
R14_U_16_RGBs6 "Res 2k 0603" FP-RC0603-0_55-IPC_B 79,-4.8 r0 bottom value=2k (schematic designator R14)
R15_U_16_RGBs1 "Res 2k 0603" FP-RC0603-0_55-IPC_B -25.854,4.8 r180 bottom value=2k (schematic designator R15)
R15_U_16_RGBs2 "Res 2k 0603" FP-RC0603-0_55-IPC_B -57.871,4.808 r180 bottom value=2k (schematic designator R15)
R15_U_16_RGBs3 "Res 2k 0603" FP-RC0603-0_55-IPC_B -89.907,4.808 r180 bottom value=2k (schematic designator R15)
R15_U_16_RGBs4 "Res 2k 0603" FP-RC0603-0_55-IPC_B 25.8,-4.8 r0 bottom value=2k (schematic designator R15)
R15_U_16_RGBs5 "Res 2k 0603" FP-RC0603-0_55-IPC_B 57.8,-4.8 r0 bottom value=2k (schematic designator R15)
R15_U_16_RGBs6 "Res 2k 0603" FP-RC0603-0_55-IPC_B 89.8,-4.8 r0 bottom value=2k (schematic designator R15)
R16 "Res 10k 0603" FP-RC0603-0_55-IPC_B -15.975,11.2 r0 top value=10k
R17 "Res 10k 0603" FP-RC0603-0_55-IPC_B 8.2,-10.275 r0 top value=10k
R18 "Res 10k 0603" FP-RC0603-0_55-IPC_B -5.775,-4.975 r0 top value=10k
R19 "Res 10k 0603" FP-RC0603-0_55-IPC_B 8.225,-7.35 r0 top value=10k
SW1 "TS-1088-AR02016" "3x4 Tactile Switch" -12.3,17.4 r0 top
SW2 "TS-1088-AR02016" "3x4 Tactile Switch" -2.25,13.1 r270 top
SW3 "TS-1088-AR02016" "3x4 Tactile Switch" 12.575,-7.425 r180 top
SW4 "TS-1088-AR02016" "3x4 Tactile Switch" -9.8,-11 r0 top
SW5 "2.54-1P TPGT" "2.54-1P TPGT-Footprint-1" -5.275,14.35 r180 top
SWCLK "Test Point 50mil SMD" "Test Point 50mil-Footprint-1" 14.5,6.2 r90 top
SWDIO "Test Point 50mil SMD" "Test Point 50mil-Footprint-1" 12.3,6.2 r90 top
U1 "RP2350A-CT" RP2350A-CT-Footprint-1 2.154,7.825 r0 top
U2 "W25Q128JVSIQ" W25Q128JVSIQ-Footprint-1 -2.3,18.8 r270 top
U3 "NCP1117ST33T3G" ONSC-SOT-223-4-318H-01_A_V -7.75,9.575 r0 top
U4 "JSMSEMI A3144E-JSM" "JSMSEMI A3144E-JSM-Footprint-1" -100,0.1 r0 bottom
U5 "JSMSEMI A3144E-JSM" "JSMSEMI A3144E-JSM-Footprint-1" 100,0 r180 bottom
U6_U_16_RGBs1 "Shenzhen Sunmoon Micro SM16206S" "Shenzhen Sunmoon Micro SM16206S-Footprint-1" -5.324,0 r180 bottom (schematic designator U6)
U6_U_16_RGBs2 "Shenzhen Sunmoon Micro SM16206S" "Shenzhen Sunmoon Micro SM16206S-Footprint-1" -37.341,0.008 r180 bottom (schematic designator U6)
U6_U_16_RGBs3 "Shenzhen Sunmoon Micro SM16206S" "Shenzhen Sunmoon Micro SM16206S-Footprint-1" -69.377,0.008 r180 bottom (schematic designator U6)
U6_U_16_RGBs4 "Shenzhen Sunmoon Micro SM16206S" "Shenzhen Sunmoon Micro SM16206S-Footprint-1" 5.27,0 r0 bottom (schematic designator U6)
U6_U_16_RGBs5 "Shenzhen Sunmoon Micro SM16206S" "Shenzhen Sunmoon Micro SM16206S-Footprint-1" 37.27,0 r0 bottom (schematic designator U6)
U6_U_16_RGBs6 "Shenzhen Sunmoon Micro SM16206S" "Shenzhen Sunmoon Micro SM16206S-Footprint-1" 69.27,0 r0 bottom (schematic designator U6)
U7_U_16_RGBs1 "Shenzhen Sunmoon Micro SM16206S" "Shenzhen Sunmoon Micro SM16206S-Footprint-1" -15.984,0 r180 bottom (schematic designator U7)
U7_U_16_RGBs2 "Shenzhen Sunmoon Micro SM16206S" "Shenzhen Sunmoon Micro SM16206S-Footprint-1" -48.001,0.008 r180 bottom (schematic designator U7)
U7_U_16_RGBs3 "Shenzhen Sunmoon Micro SM16206S" "Shenzhen Sunmoon Micro SM16206S-Footprint-1" -80.038,0.008 r180 bottom (schematic designator U7)
U7_U_16_RGBs4 "Shenzhen Sunmoon Micro SM16206S" "Shenzhen Sunmoon Micro SM16206S-Footprint-1" 15.93,0 r0 bottom (schematic designator U7)
U7_U_16_RGBs5 "Shenzhen Sunmoon Micro SM16206S" "Shenzhen Sunmoon Micro SM16206S-Footprint-1" 47.93,0 r0 bottom (schematic designator U7)
U7_U_16_RGBs6 "Shenzhen Sunmoon Micro SM16206S" "Shenzhen Sunmoon Micro SM16206S-Footprint-1" 79.93,0 r0 bottom (schematic designator U7)
U8_U_16_RGBs1 "Shenzhen Sunmoon Micro SM16206S" "Shenzhen Sunmoon Micro SM16206S-Footprint-1" -26.654,0 r180 bottom (schematic designator U8)
U8_U_16_RGBs2 "Shenzhen Sunmoon Micro SM16206S" "Shenzhen Sunmoon Micro SM16206S-Footprint-1" -58.671,0.008 r180 bottom (schematic designator U8)
U8_U_16_RGBs3 "Shenzhen Sunmoon Micro SM16206S" "Shenzhen Sunmoon Micro SM16206S-Footprint-1" -90.707,0.008 r180 bottom (schematic designator U8)
U8_U_16_RGBs4 "Shenzhen Sunmoon Micro SM16206S" "Shenzhen Sunmoon Micro SM16206S-Footprint-1" 26.6,0 r0 bottom (schematic designator U8)
U8_U_16_RGBs5 "Shenzhen Sunmoon Micro SM16206S" "Shenzhen Sunmoon Micro SM16206S-Footprint-1" 58.6,0 r0 bottom (schematic designator U8)
U8_U_16_RGBs6 "Shenzhen Sunmoon Micro SM16206S" "Shenzhen Sunmoon Micro SM16206S-Footprint-1" 90.6,0 r0 bottom (schematic designator U8)
U9 "NCP1117ST33T3G" ONSC-SOT-223-4-318H-01_A_V 14,-12.95 r0 top
U10 "TS3USB221RSER" RSE0010A_V -16.65,14.875 r270 top
USBC1 "TYPE-C-31-M-12" TYPE-C-31-M-12-Footprint-1 -8.678,15.661 r45 bottom
Y1 "ABM8-272-T3" ABM8-272-T3-Footprint-1 0.6,7.4 r270 top

## Footprints (in the part's own frame and the unit in brackets; to place one, negate y for a bottom-side part, rotate by r counter-clockwise, add the part's x,y. Pads: shape width x height; smd on the part's side, far side on the other; paste and mask are expansions set on the pad)
"2.54-1P TPGT-Footprint-1" [mm]
  rect 2.2x1.1 smd: 1(0,0) 2(8.8,0)
  body extent -0.3,-1.25 9.1,1.25, height 3.8
"3x4 Tactile Switch" [mm]
  rect 1.05x2 smd: 1(-2.225,0) 2(2.225,0)
  body extent -2.4,-1.43 2.4,1.48, height 1.95
ABM8-272-T3-Footprint-1 [mm]
  rect 1.4x1.199 smd: 1(-1.1,-0.85) 2(1.1,-0.85) 3(1.1,0.85) 4(-1.1,0.85)
  silkscreen extent -2.26,-1.91 2.03,1.68, body extent -1.57,-1.25 1.63,1.25, height 0.7
AOTA-B201610S3R3-101-T-Footprint-1 [mil]
  rect 39.4x63 smd paste+0 mask+2: 1(-39.35,0) 2(39.35,0)
  silkscreen extent -8,-32 50,53, body extent -39,-32 39,31, height 37
"EKINGLUX E6C0606RGBC3UDA-Footprint-1" [mil]
  rect 27.6x29.5 smd: 1(-24.4,18.7) 2(24.4,18.7) 3(-24.4,-18.7) 4(24.4,-18.7)
  silkscreen extent 45,-10 55,10, body extent -31,-31 31,31, height 35
FP-CC0603-DA-IPC_B [mm]
  rect 1.058x0.912 smd paste+0 mask+0: 1(0,0) 2(1.354,0)
  body extent -0.78,-0.71 2.13,0.71, height 0.25
FP-ESP32-C3-MINI-1-H4-MFG [mm]
  rect 0.8x0.4 smd paste+0 mask+0: 1(-5.9,4) 2(-5.9,3.2) 3(-5.9,2.4) 4(-5.9,1.6) 5(-5.9,0.8) 6(-5.9,0) 7(-5.9,-0.8) 8(-5.9,-1.6) 9(-5.9,-2.4) 10(-5.9,-3.2) 11(-5.9,-4) 25(5.9,-4) 26(5.9,-3.2) 27(5.9,-2.4) 28(5.9,-1.6) 29(5.9,-0.8) 30(5.9,0) 31(5.9,0.8) 32(5.9,1.6) 33(5.9,2.4) 34(5.9,3.2) 35(5.9,4)
  rect 0.4x0.8 smd paste+0 mask+0: 12(-4.8,-4.9) 13(-4,-4.9) 14(-3.2,-4.9) 15(-2.4,-4.9) 16(-1.6,-4.9) 17(-0.8,-4.9) 18(0,-4.9) 19(0.8,-4.9) 20(1.6,-4.9) 21(2.4,-4.9) 22(3.2,-4.9) 23(4,-4.9) 24(4.8,-4.9) 36(4.8,4.9) 37(4,4.9) 38(3.2,4.9) 39(2.4,4.9) 40(1.6,4.9) 41(0.8,4.9) 42(0,4.9) 43(-0.8,4.9) 44(-1.6,4.9) 45(-2.4,4.9) 46(-3.2,4.9) 47(-4,4.9) 48(-4.8,4.9)
  rect 1.45x1.45 smd paste+0 mask+0: 49(-1.975,0) 49(-1.975,-1.975) 49(0,1.975) 49(0,0) 49(0,-1.975) 49(1.975,1.975) 49(1.975,0) 49(1.975,-1.975)
  round 1.207 smd paste+0 mask+0: 49(-1.926,1.926)
  rect 0.7x0.7 smd paste+0 mask+0: 50(5.95,4.95) 51(5.95,-4.95) 52(-5.95,-4.95) 53(-5.95,4.95)
  Top Layer region: -2.7,1.25 -2.7,2.1 -2.1,2.7 -1.25,2.7 -1.25,1.25
  Keep-Out Layer region: -6.6,5.6 6.6,5.6 6.6,11 -6.6,11
  silkscreen extent -7.4,4.08 6.68,11.07, body extent -6.78,-5.77 6.78,11.17, height 0.25
FP-RC0603-0_55-IPC_B [mm]
  rect 0.859x0.912 smd paste+0 mask+0: 1(-0.777,0) 2(0.777,0)
  body extent -0.8,-0.4 0.8,0.4, height 0.55
"JSMSEMI A3144E-JSM-Footprint-1" [mm]
  rect 1.25x0.701 smd: 1(1.25,-0.95) 2(-1.25,0) 3(1.25,0.95)
  silkscreen extent -0.76,-1.52 2.28,1.52, body extent -1.39,-1.44 1.41,1.46, height 1.1
ONSC-SMA-2-403D-02_V [mm] "Molded, 2-Leads, Body 4.57x2.92mm"
  rect 2x2 smd: 1(-2,0) 2(2,0)
  silkscreen extent -3.67,-1.3 0.74,1.3, body extent -2.16,-1.3 2.16,1.3, height 2.2
ONSC-SOT-223-4-318H-01_A_V [mm] "SOT223, 4-Leads, Body 6.5x3.5mm, Pitch 2.3mm"
  rect 2x1.5 smd: 1(-3.15,2.3) 2(-3.15,0) 3(-3.15,-2.3)
  rect 2x3.8 smd: 4(3.15,0)
  silkscreen extent -3.55,-3.25 1.75,3.72, body extent -1.75,-3.25 1.75,3.25, height 1.8
RP2350A-CT-Footprint-1 [mm]
  rect 0.874x0.201 smd paste-100 mask+0.051: 1(0.871,6.85) 2(0.871,6.449) 3(0.871,6.05) 4(0.871,5.649) 5(0.871,5.25) 6(0.871,4.849) 7(0.871,4.45) 8(0.871,4.049) 9(0.871,3.65) 10(0.871,3.249) 11(0.871,2.85) 12(0.871,2.449) 13(0.871,2.05) 14(0.871,1.648) 15(0.871,1.25) 31(8.021,1.25) 32(8.021,1.651) 33(8.021,2.05) 34(8.021,2.449) 35(8.021,2.85) 36(8.021,3.249) 37(8.021,3.65) 38(8.021,4.049) 39(8.021,4.45) 40(8.021,4.849) 41(8.021,5.25) 42(8.021,5.649) 43(8.021,6.05) 44(8.021,6.449) 45(8.021,6.85)
  rect 0.201x0.874 smd paste-100 mask+0.051: 16(1.646,0.475) 17(2.045,0.475) 18(2.446,0.475) 19(2.845,0.475) 20(3.246,0.475) 21(3.645,0.475) 22(4.046,0.475) 23(4.445,0.475) 24(4.846,0.475) 25(5.245,0.475) 26(5.646,0.475) 27(6.045,0.475) 28(6.444,0.475) 29(6.845,0.475) 30(7.244,0.475) 46(7.244,7.625) 47(6.845,7.625) 48(6.444,7.625) 49(6.045,7.625) 50(5.646,7.625) 51(5.245,7.625) 52(4.846,7.625) 53(4.445,7.625) 54(4.046,7.625) 55(3.645,7.625) 56(3.246,7.625) 57(2.845,7.625) 58(2.446,7.625) 59(2.045,7.625) 60(1.646,7.625)
  rect 3.401x3.401 smd paste-100 mask+0.051: 61(4.445,4.049)
  silkscreen extent 0.13,0.45 8.05,7.73, body extent 0.89,0.51 8,7.61, height 0.9
RSE0010A_V [mm] "QFN, 10-Leads, Body 1.5x2mm, Pitch 0.5mm, TI Recommended"
  rrect50% 0.55x0.2 smd: 1(-0.675,0.75) 2(-0.675,0.25) 3(-0.675,-0.25) 4(-0.675,-0.75) 6(0.675,-0.75) 7(0.675,-0.25) 8(0.675,0.25) 9(0.675,0.75)
  rrect33% 0.3x0.6 smd: 5(0,-0.9) 10(0,0.9)
  silkscreen extent -1.07,-1.17 0.77,1.18, body extent -0.77,-1.02 0.78,1.03, height 0.61
"Shenzhen Sunmoon Micro SM16206S-Footprint-1" [mil]
  oval 14x59.1 smd: 1(-137.5,-106) 2(-112.5,-106) 3(-87.5,-106) 4(-62.5,-106) 5(-37.5,-106) 6(-12.5,-106) 7(12.5,-106) 8(37.5,-106) 9(62.5,-106) 10(87.5,-106) 11(112.5,-106) 12(137.5,-106) 13(137.5,106) 14(112.5,106) 15(87.5,106) 16(62.5,106) 17(37.5,106) 18(12.5,106) 19(-12.5,106) 20(-37.5,106) 21(-62.5,106) 22(-87.5,106) 23(-112.5,106) 24(-137.5,106)
  silkscreen extent -173,-115 174,79, body extent -171,-118 171,123, height 63
"Test Point 50mil-Footprint-1" [mm]
  round 1.27 smd: 1(0,0)
  silkscreen extent -0.89,-0.89 0.89,0.89
"THT 100mil pad-Footprint-1" [mm]
  round 2.54 hole 1.2: 1(0,0)
TYPE-C-31-M-12-Footprint-1 [mm]
  oval 1.2x2 hole 0.8 slot 1.6 at 90 deg: 1(0,0) 4(-8.65,0)
  oval 1.2x1.8 hole 0.8 slot 1.4 at 90 deg copper offset 0,0: 2(0,-4.18) 3(-8.65,-4.18)
  round 0.025 smd paste-100 mask+0.051: A1B12(-7.525,0.768) A4B9(-6.731,0.762)
  rect 0.3x1.3 smd paste-100 mask+0.051: A5(-5.575,0.768) A6(-4.575,0.768) A7(-4.075,0.768) A8(-3.075,0.768) B5(-2.575,0.768) B6(-3.575,0.768) B7(-5.075,0.768) B8(-6.075,0.768)
  rect 0.6x1.3 smd paste-100 mask+0.051: B1A12(-1.125,0.768) B4A9(-1.925,0.768)
  Keep-Out Layer board cut-out: -1.05,-0.5 -1.087,-0.663 -1.191,-0.793 -1.342,-0.866 -1.508,-0.866 -1.659,-0.793 -1.763,-0.663 -1.8,-0.5 -1.8,-0.5 -1.763,-0.337 -1.659,-0.207 -1.508,-0.134 -1.342,-0.134 -1.191,-0.207 -1.087,-0.337 -1.05,-0.5
  Keep-Out Layer board cut-out: -6.85,-0.5 -6.887,-0.663 -6.991,-0.793 -7.141,-0.866 -7.308,-0.866 -7.459,-0.793 -7.563,-0.663 -7.6,-0.5 -7.6,-0.5 -7.563,-0.337 -7.459,-0.207 -7.308,-0.134 -7.141,-0.134 -6.991,-0.207 -6.887,-0.337 -6.85,-0.5
  Keep-Out Layer circle w0.025: c-1.425,-0.5 r0.375
  Keep-Out Layer circle w0.025: c-7.225,-0.5 r0.375
  Keep-Out Layer region: -1.05,-0.5 -1.087,-0.663 -1.191,-0.793 -1.342,-0.866 -1.508,-0.866 -1.659,-0.793 -1.763,-0.663 -1.8,-0.5 -1.8,-0.5 -1.763,-0.337 -1.659,-0.207 -1.508,-0.134 -1.342,-0.134 -1.191,-0.207 -1.087,-0.337 -1.05,-0.5
  Keep-Out Layer region: -6.85,-0.5 -6.887,-0.663 -6.991,-0.793 -7.141,-0.866 -7.308,-0.866 -7.459,-0.793 -7.563,-0.663 -7.6,-0.5 -7.6,-0.5 -7.563,-0.337 -7.459,-0.207 -7.308,-0.134 -7.141,-0.134 -6.991,-0.207 -6.887,-0.337 -6.85,-0.5
  silkscreen extent -8.79,-6.8 0.15,-1.22, body extent -8.79,-6.7 0.15,1.2, height 3.25
W25Q128JVSIQ-Footprint-1 [mil]
  oval 24.8x88.6 smd: 1(-75,-139) 2(-25,-139) 3(25,-139) 4(75,-139) 5(75,139) 6(25,139) 7(-25,139) 8(-75,139)
  silkscreen extent -111,-145 104,86, body extent -105,-159 103,152, height 79

## Part data
5V_W GND_W: library part CMP-00020-1, "40mil hole, 100mil pad THT", Hole Diameter=40mil, Pad Diameter=100mil
C1 C3 C4 C5 C6 C7 C8 C9 C10 C11 C12 C17 C23 C28_U_16_RGBs1 C28_U_16_RGBs2 C28_U_16_RGBs3 C28_U_16_RGBs4 C28_U_16_RGBs5 C28_U_16_RGBs6 C29_U_16_RGBs1 C29_U_16_RGBs2 C29_U_16_RGBs3 C29_U_16_RGBs4 C29_U_16_RGBs5 C29_U_16_RGBs6 C30_U_16_RGBs1 C30_U_16_RGBs2 C30_U_16_RGBs3 C30_U_16_RGBs4 C30_U_16_RGBs5 C30_U_16_RGBs6 C32 C34 C37: library part CMP-00006-5, "100nF 50V 10% X7R 0603 SMD Capacitor Decoupling", Case/Package=0603, Temperature Coefficient=X7R, Tolerance=10%, Voltage Rating=50V, Mounting Technology=SMT
C2 C14 C15 C16: library part CMP-001-00004-1, "4.7uF 16V 10% X5R 0603 SMD Capacitor", Case/Package=0603, Temperature Coefficient=X5R, Tolerance=10%, Voltage Rating=16V, Mounting Technology=SMT
C13 C22 C31_U_16_RGBs1 C31_U_16_RGBs2 C31_U_16_RGBs3 C31_U_16_RGBs4 C31_U_16_RGBs5 C31_U_16_RGBs6 C33: library part CMP-001-00003-1, "22uF 6.3V 20% X5R 0603 SMD Capacitor", Case/Package=0603, Temperature Coefficient=X5R, Tolerance=20%, Voltage Rating=6.3V, Mounting Technology=SMT
C18 C19: library part CMP-001-00005-1, "15pF 50V 5% C0G 0603 SMD Capacitor", Case/Package=0603, Temperature Coefficient=C0G, Tolerance=5%, Voltage Rating=50V, Mounting Technology=SMT
C20 C21 C35 C36: library part CMP-001-00002-1, "10uF 6.3V 10% X5R 0603 SMD Capacitor", Case/Package=0603, Temperature Coefficient=X5R, Tolerance=10%, Voltage Rating=6.3V, Mounting Technology=SMT
C24 C27: library part CMP-001-00007-1, "4.7nF 50V 10% X7R 0603 SMD Capacitor", Case/Package=0603, Temperature Coefficient=X7R, Tolerance=10%, Voltage Rating=50V, Mounting Technology=SMT
C25 C26: library part CMP-001-00006-2, "1nF 50V 10% X7R 0603 SMD Capacitor", Case/Package=0603, Temperature Coefficient=X7R, Tolerance=10%, Voltage Rating=50V, Mounting Technology=SMT
D1 D2: library part CMP-00016-2, "Schottky Barrier Rectifier Diode 40 Volt 1A Automotive 2-Pin SMA"
L1: library part CMP-00014-3, "General Purpose Inductor, 3.3uH, 20%, 1 Element, SMD, 0806", Case/Package=0806, Tolerance=20%
LED1_U_16_RGBs1 LED1_U_16_RGBs2 LED1_U_16_RGBs3 LED1_U_16_RGBs4 LED1_U_16_RGBs5 LED1_U_16_RGBs6 LED2_U_16_RGBs1 LED2_U_16_RGBs2 LED2_U_16_RGBs3 LED2_U_16_RGBs4 LED2_U_16_RGBs5 LED2_U_16_RGBs6 LED3_U_16_RGBs1 LED3_U_16_RGBs2 LED3_U_16_RGBs3 LED3_U_16_RGBs4 LED3_U_16_RGBs5 LED3_U_16_RGBs6 LED4_U_16_RGBs1 LED4_U_16_RGBs2 LED4_U_16_RGBs3 LED4_U_16_RGBs4 LED4_U_16_RGBs5 LED4_U_16_RGBs6 LED5_U_16_RGBs1 LED5_U_16_RGBs2 LED5_U_16_RGBs3 LED5_U_16_RGBs4 LED5_U_16_RGBs5 LED5_U_16_RGBs6 LED6_U_16_RGBs1 LED6_U_16_RGBs2 LED6_U_16_RGBs3 LED6_U_16_RGBs4 LED6_U_16_RGBs5 LED6_U_16_RGBs6 LED7_U_16_RGBs1 LED7_U_16_RGBs2 LED7_U_16_RGBs3 LED7_U_16_RGBs4 LED7_U_16_RGBs5 LED7_U_16_RGBs6 LED8_U_16_RGBs1 LED8_U_16_RGBs2 LED8_U_16_RGBs3 LED8_U_16_RGBs4 LED8_U_16_RGBs5 LED8_U_16_RGBs6 LED9_U_16_RGBs1 LED9_U_16_RGBs2 LED9_U_16_RGBs3 LED9_U_16_RGBs4 LED9_U_16_RGBs5 LED9_U_16_RGBs6 LED10_U_16_RGBs1 LED10_U_16_RGBs2 LED10_U_16_RGBs3 LED10_U_16_RGBs4 LED10_U_16_RGBs5 LED10_U_16_RGBs6 LED11_U_16_RGBs1 LED11_U_16_RGBs2 LED11_U_16_RGBs3 LED11_U_16_RGBs4 LED11_U_16_RGBs5 LED11_U_16_RGBs6 LED12_U_16_RGBs1 LED12_U_16_RGBs2 LED12_U_16_RGBs3 LED12_U_16_RGBs4 LED12_U_16_RGBs5 LED12_U_16_RGBs6 LED13_U_16_RGBs1 LED13_U_16_RGBs2 LED13_U_16_RGBs3 LED13_U_16_RGBs4 LED13_U_16_RGBs5 LED13_U_16_RGBs6 LED14_U_16_RGBs1 LED14_U_16_RGBs2 LED14_U_16_RGBs3 LED14_U_16_RGBs4 LED14_U_16_RGBs5 LED14_U_16_RGBs6 LED15_U_16_RGBs1 LED15_U_16_RGBs2 LED15_U_16_RGBs3 LED15_U_16_RGBs4 LED15_U_16_RGBs5 LED15_U_16_RGBs6 LED16_U_16_RGBs1 LED16_U_16_RGBs2 LED16_U_16_RGBs3 LED16_U_16_RGBs4 LED16_U_16_RGBs5 LED16_U_16_RGBs6: library part CMP-00018-4, "1.6*1.6*0.6mm RGB SMD CHIP LED"
MD1: library part CMP-00032-1, "-96dBm 20.5dBm On-board PCB antenna 2.4GHz SMD, 13.2x16.6mm WiFi Modules ROHS"
R1 R2: library part CMP-009-00005-1, "5.1k 1% 100mW 0603 SMD Resistor", Case/Package=0603, Power Rating=100mW, Tolerance=1%, Mounting Technology=SMT
R3: library part CMP-009-00016-1, "10R 1% 100mW 0603 SMD Resistor", Case/Package=0603, Power Rating=100mW, Tolerance=0.1%, Mounting Technology="Surface Mount"
R4 R5: library part CMP-009-00017-1, "27R 1% 100mW 0603 SMD Resistor", Case/Package=0603, Power Rating=100mW, Tolerance=0.1%, Mounting Technology="Surface Mount"
R6 R7 R8: library part CMP-00011-1, "1k 1% 100mW 0603 SMD Resistor", Case/Package=0603, Power Rating=100mW, Tolerance=1%, Mounting Technology=SMT
R9 R12: library part CMP-009-00020-1, "100R 1% 100mW 0603 SMD Resistor", Case/Package=0603, Power Rating=100mW, Tolerance=1%, Mounting Technology=SMT
R10 R11: library part CMP-009-00019-1, "4.7k 1% 100mW 0603 SMD Resistor", Case/Package=0603, Power Rating=100mW, Tolerance=1%, Mounting Technology=SMT
R13_U_16_RGBs1 R13_U_16_RGBs2 R13_U_16_RGBs3 R13_U_16_RGBs4 R13_U_16_RGBs5 R13_U_16_RGBs6 R14_U_16_RGBs1 R14_U_16_RGBs2 R14_U_16_RGBs3 R14_U_16_RGBs4 R14_U_16_RGBs5 R14_U_16_RGBs6 R15_U_16_RGBs1 R15_U_16_RGBs2 R15_U_16_RGBs3 R15_U_16_RGBs4 R15_U_16_RGBs5 R15_U_16_RGBs6: library part CMP-009-00018-1, "2k 1% 100mW 0603 SMD Resistor", Case/Package=0603, Power Rating=100mW, Tolerance=1%, Mounting Technology=SMT
R16 R17 R18 R19: library part CMP-009-00000-1, "10k 1% 100mW 0603 SMD Resistor", Case/Package=0603, Power Rating=100mW, Tolerance=1%, Mounting Technology=SMT
SW1 SW2 SW3 SW4: library part CMP-002-000002-2, "3*4*2.0 160GF Surface mount no-post tactile switch"
SW5: library part CMP-002-000003-2, "1 Digit SPST 24V Black 25mA 3000 times Flat Toggle, Raised Style SMD DIP Switches ROHS"
SWCLK SWDIO: library part CMP-00019-2, "Simple SMD test point with 50mil diameter circular footprint", Diameter=50mil
U1: library part CMP-00007-7, "Rp2350 Cortex-M33 Qfn-60 Ct"
U2: library part CMP-00013-1, "NOR Flash Serial (SPI, Dual SPI, Quad SPI) 3.3V 128M-bit 16M x 8 6ns 8-Pin SOIC Tube", Nominal Supply Voltage (DC)=3V, Memory Format=FLASH
U3 U9: library part CMP-00015-1, "NCP1117 Series 1 A 3.3 V Fixed Output LDO Positive Voltage Regulator - SOT-223", Max Supply Voltage=15V, Min Input Voltage=4.75V, Nominal Output Voltage=3.3V, Pins=4
U4 U5: library part CMP-00017-3, "High-voltage-resistant and high-sensitivity unipolar Hall switch"
U6_U_16_RGBs1 U6_U_16_RGBs2 U6_U_16_RGBs3 U6_U_16_RGBs4 U6_U_16_RGBs5 U6_U_16_RGBs6 U7_U_16_RGBs1 U7_U_16_RGBs2 U7_U_16_RGBs3 U7_U_16_RGBs4 U7_U_16_RGBs5 U7_U_16_RGBs6 U8_U_16_RGBs1 U8_U_16_RGBs2 U8_U_16_RGBs3 U8_U_16_RGBs4 U8_U_16_RGBs5 U8_U_16_RGBs6: library part CMP-00010-3, "LED constant current driver chip, 16-channel constant current source output, externally adjustable output current, 25MHz clock frequency"
U10: library part CMP-00033-1, "IC Usb Switch Dual 1X2 10UQFN Usb Switch IC 2 Channel 10-UQFN (2.0X1.5)", Case/Package=QFN
USBC1: library part CMP-00002-4, "USB Type-C Connector Female SMD 16 pin", Current Rating=5A, Gender=Female, Mounting Technology=SMT
Y1: library part CMP-00009-2, "Parallel - Fundamental Quartz Crystal, 12MHz Nom", Frequency=12MHz, Frequency Stability=30ppm, Frequency Tolerance=0.003%, Load Capacitance=10pF, Max Operating Temperature=85°C, Min Operating Temperature=-40°C, ESR=50Ω, Mounting Technology="Surface Mount"

## Free pads (board coordinates)
  round 4 hole 2.4: 2(-17.5,-8.5) 2(-17.5,8.5) 2(17.5,-8.5) 2(17.5,8.5)

## Via types
v1: diameter 0.45, hole 0.2, Top Layer to Bottom Layer, tented both sides, 605 vias
v2: diameter 0.65, hole 0.4, Top Layer to Bottom Layer, tented both sides, 28 vias
v3: diameter 0.5, hole 0.3, Top Layer to Bottom Layer, tented both sides, 12 vias
v4: diameter 0.45, hole 0.2, Top Layer to Bottom Layer, 12 vias

## Nets (pads, with @x,y where several pads share a name; then routed paths per layer and width w, separated by ;. In a path a pad name is that pad's centre, name@x,y a point inside that pad or via, vN(x,y) a via of type N, cw(c..) or ccw(c..) an arc to the next point about the centre after c; other vN are vias at no path point)
+1V1: C1.2 C2.2 C3.2 C16.2 L1.2 U1.6 U1.23 U1.39 U1.50 | length 41.9
  Top Layer w0.2: C3.2@1.554,13.2 C3.2@1.627,13.2 ; v1(2.017,14.125) 1.983,14.091 1.983,13.556 C3.2@1.627,13.2 ; U1.6@3.025,12.674 2.153,12.674 C3.2@1.627,13.2 ; U1.23@6.599,8.3 6.599,7.963 6.7,7.862 6.7,7.773 7.9,6.573 C2.2@7.9,6.5 7.7,6.3 v1(7.119,6.3) ; U1.50@7.8,15.675 7.8,16.332 7.571,16.561 7.571,18.144 8.227,18.8 C16.2@8.3,18.8 ; U1.39@10.175,12.275 11.525,12.275 C1.2@11.6,12.2 11.7,12.3 v1(11.7,13.006)
  Top Layer w0.5: v1(8.181,17.906) 8.181,18.681 C16.2@8.3,18.8
  Top Layer w1: L1.2@7.376,20.5 7.376,20.425 7.45,20.425 8.271,19.604 8.271,18.829 C16.2@8.3,18.8
  Power w0.5: v1(2.017,14.125) 2.136,14.006 2.554,14.006 6.454,17.906 v1(8.181,17.906) 8.181,17.391 ; v1(7.119,6.3) 7.119,6.498 8.744,8.122 8.744,9.993 8.101,10.636 8.101,13.4 8.475,13.774 8.475,14.809 7.581,15.702 7.581,16.791 8.181,17.391 ; v1(11.7,13.006) 8.181,16.525 8.181,17.391
+3V3_ESP: C32.2 C33.2 C36.2 MD1.3 R17.2 R18.1 R19.2 U9.2 U9.4 | length 42.9
  Top Layer w0.1: R18.1@-6.552,-4.975 -6.552,-5.002 -6.172,-5.381 -6.146,-5.381 -5.127,-6.4 -3.738,-6.4 -3.65,-6.488 -3.65,-7.312 -2.762,-8.2 2.525,-8.2 3.756,-9.431 3.756,-12.306 5.7,-14.25 MD1.3@5.9,-14.25 ; R17.2@8.977,-10.275 9.5,-10.275 9.7,-10.075 9.7,-9.838 10.538,-9 ; R19.2@9.002,-7.35 9.002,-7.377 9.583,-7.958 9.583,-8.395 9.763,-8.575 10.113,-8.575 10.538,-9 ; U9.2@10.85,-12.95 11.1,-12.95 12.75,-11.3 12.75,-10.453 11.297,-9 10.538,-9
  Top Layer w0.5: MD1.3@5.9,-14.25 6.727,-14.25 7.45,-14.973 C32.2@7.45,-15.046
  Top Layer w0.8: C32.2@7.45,-15.046 7.462,-15.034 7.462,-13.316 C33.2@7.475,-13.304 C36.2@8.975,-13.304 ; C36.2@8.975,-13.231 9.031,-13.175 10.625,-13.175 U9.2@10.85,-12.95
  Top Layer w1.5: U9.2@10.85,-12.95 U9.4@17.15,-12.95